# Altium PCB OSP_Carrier_V8_ascii.PcbDoc (part 1 of 3)
Units mm, origin at the board's own origin, x right, y up, seen from the top; angles counter-clockwise.
Board outline 64.1 x 51.1 mm, 4 copper layers (Component Side, Signal Layer 1, Signal Layer 2, Solder Side), stack 1.58 mm thick; 182 components, 144 nets, 1232 pads, 422 vias.
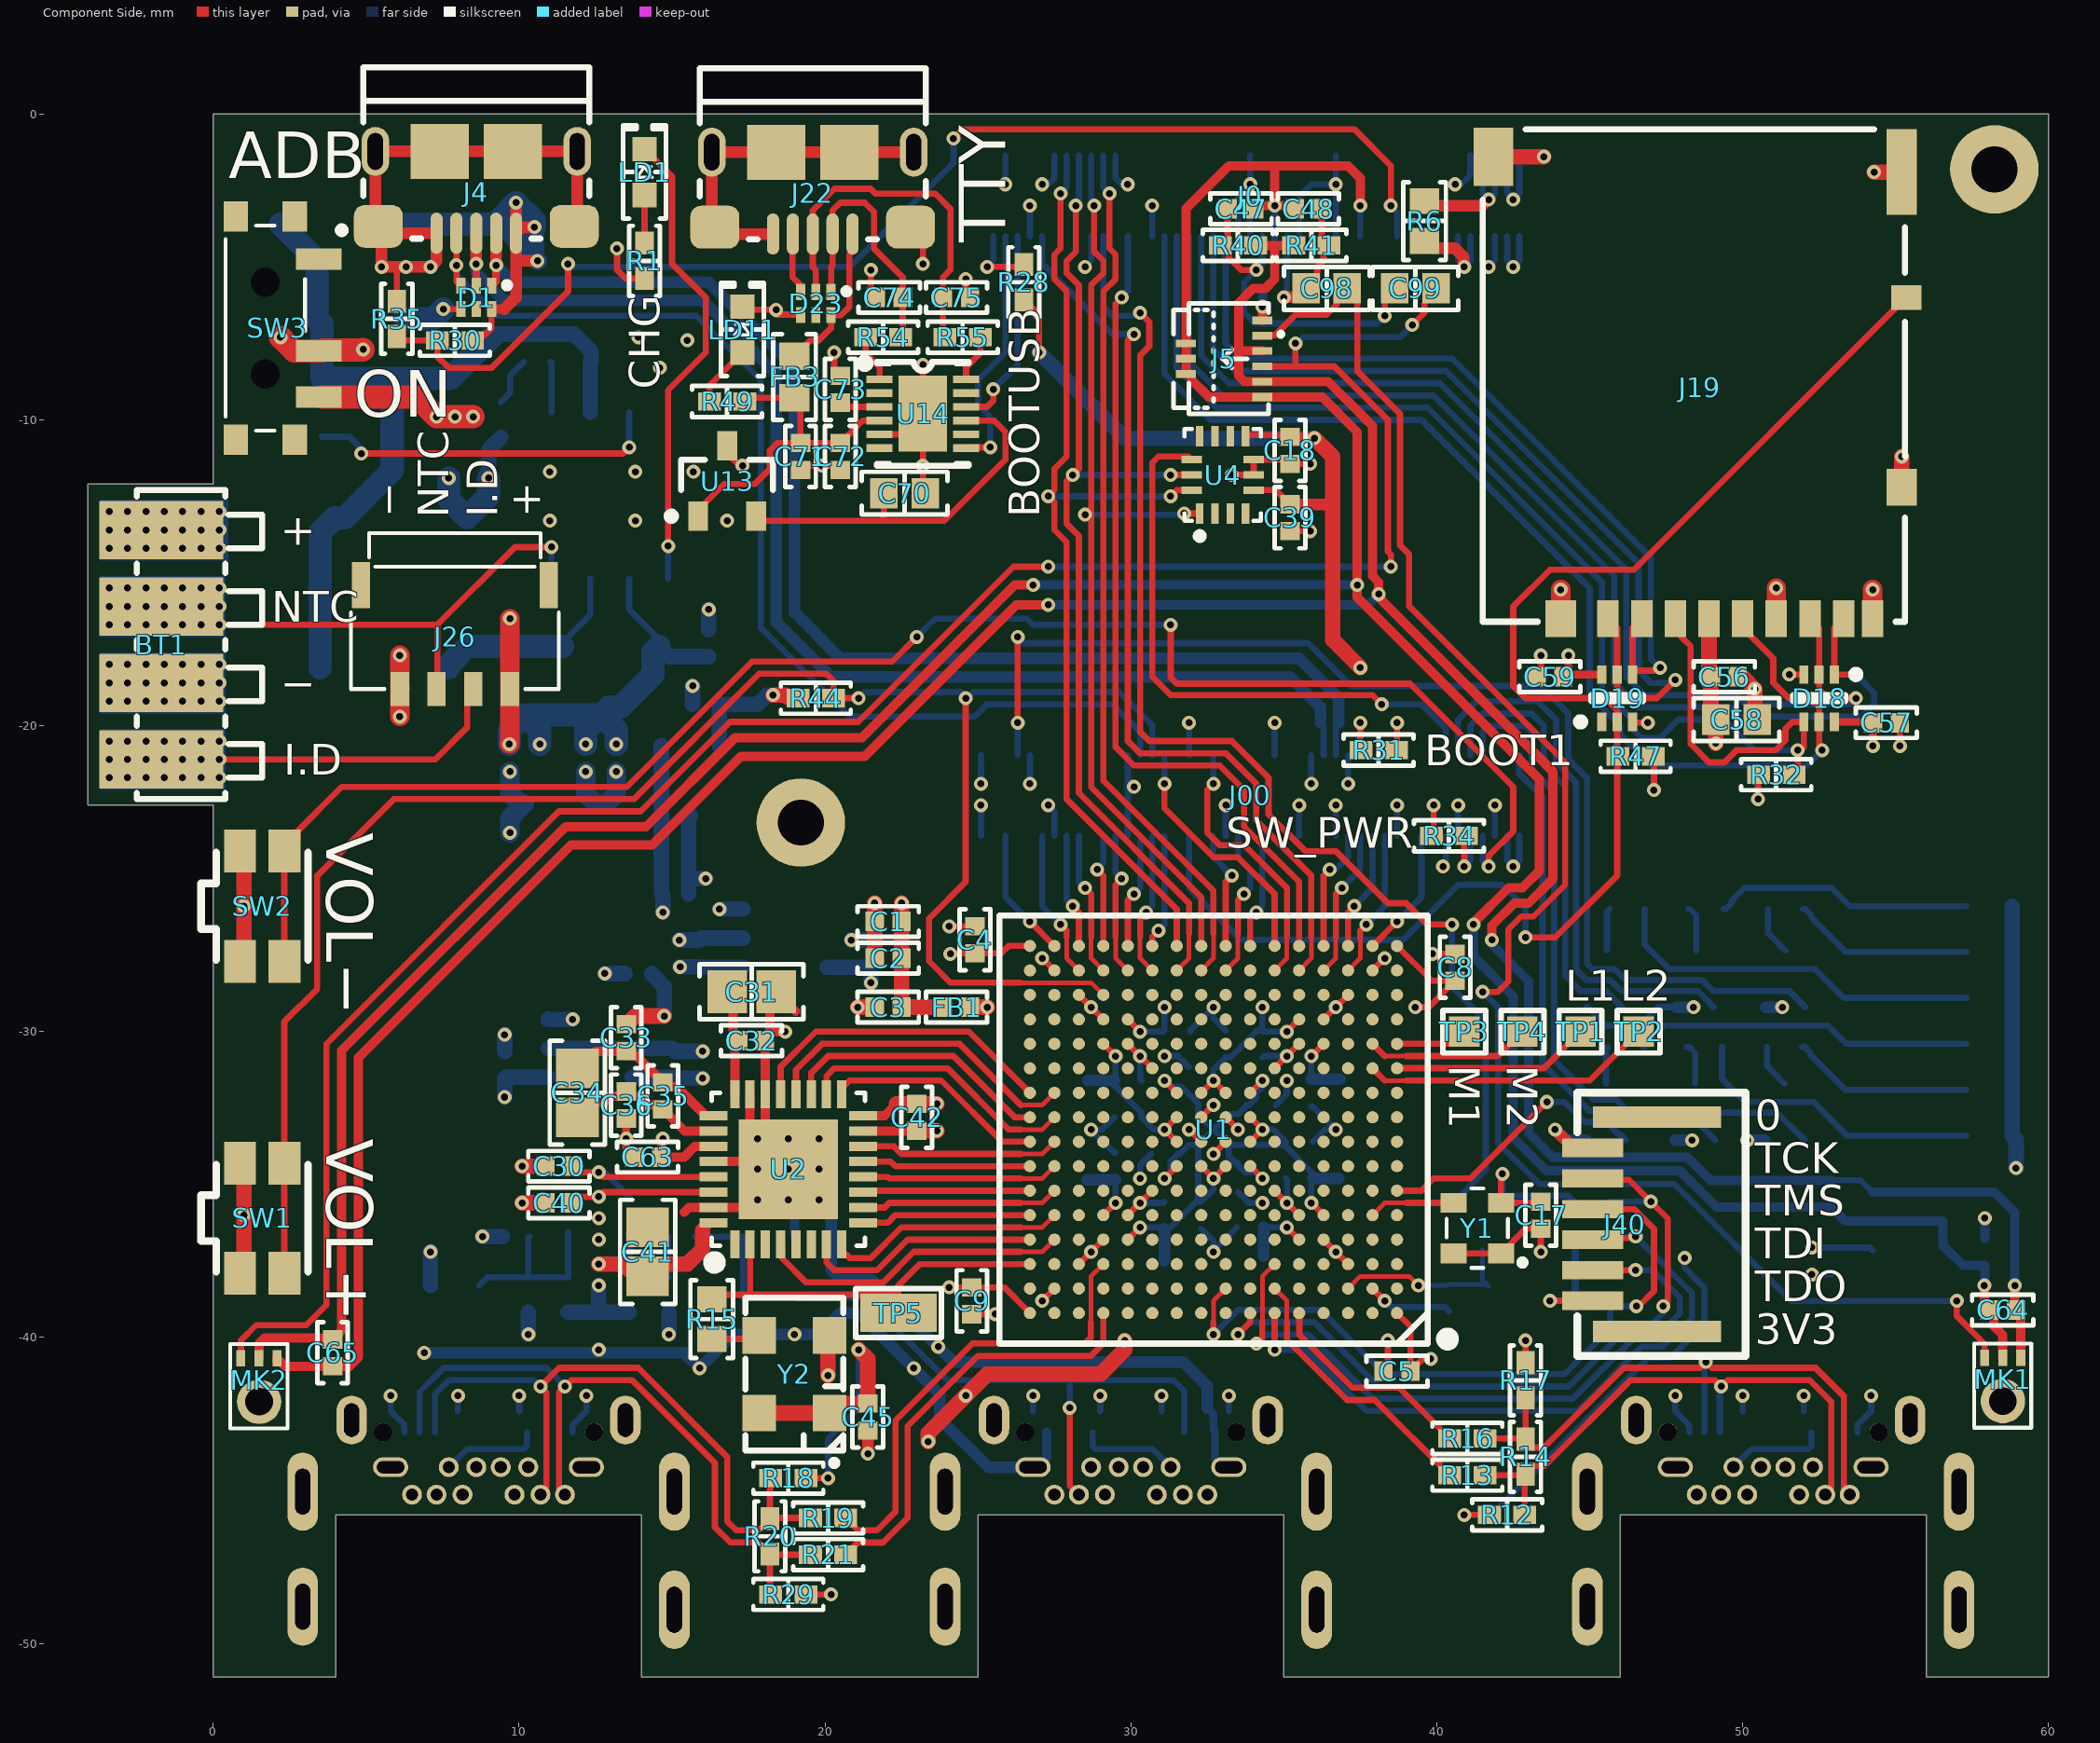
[diagram p0: Component Side view]
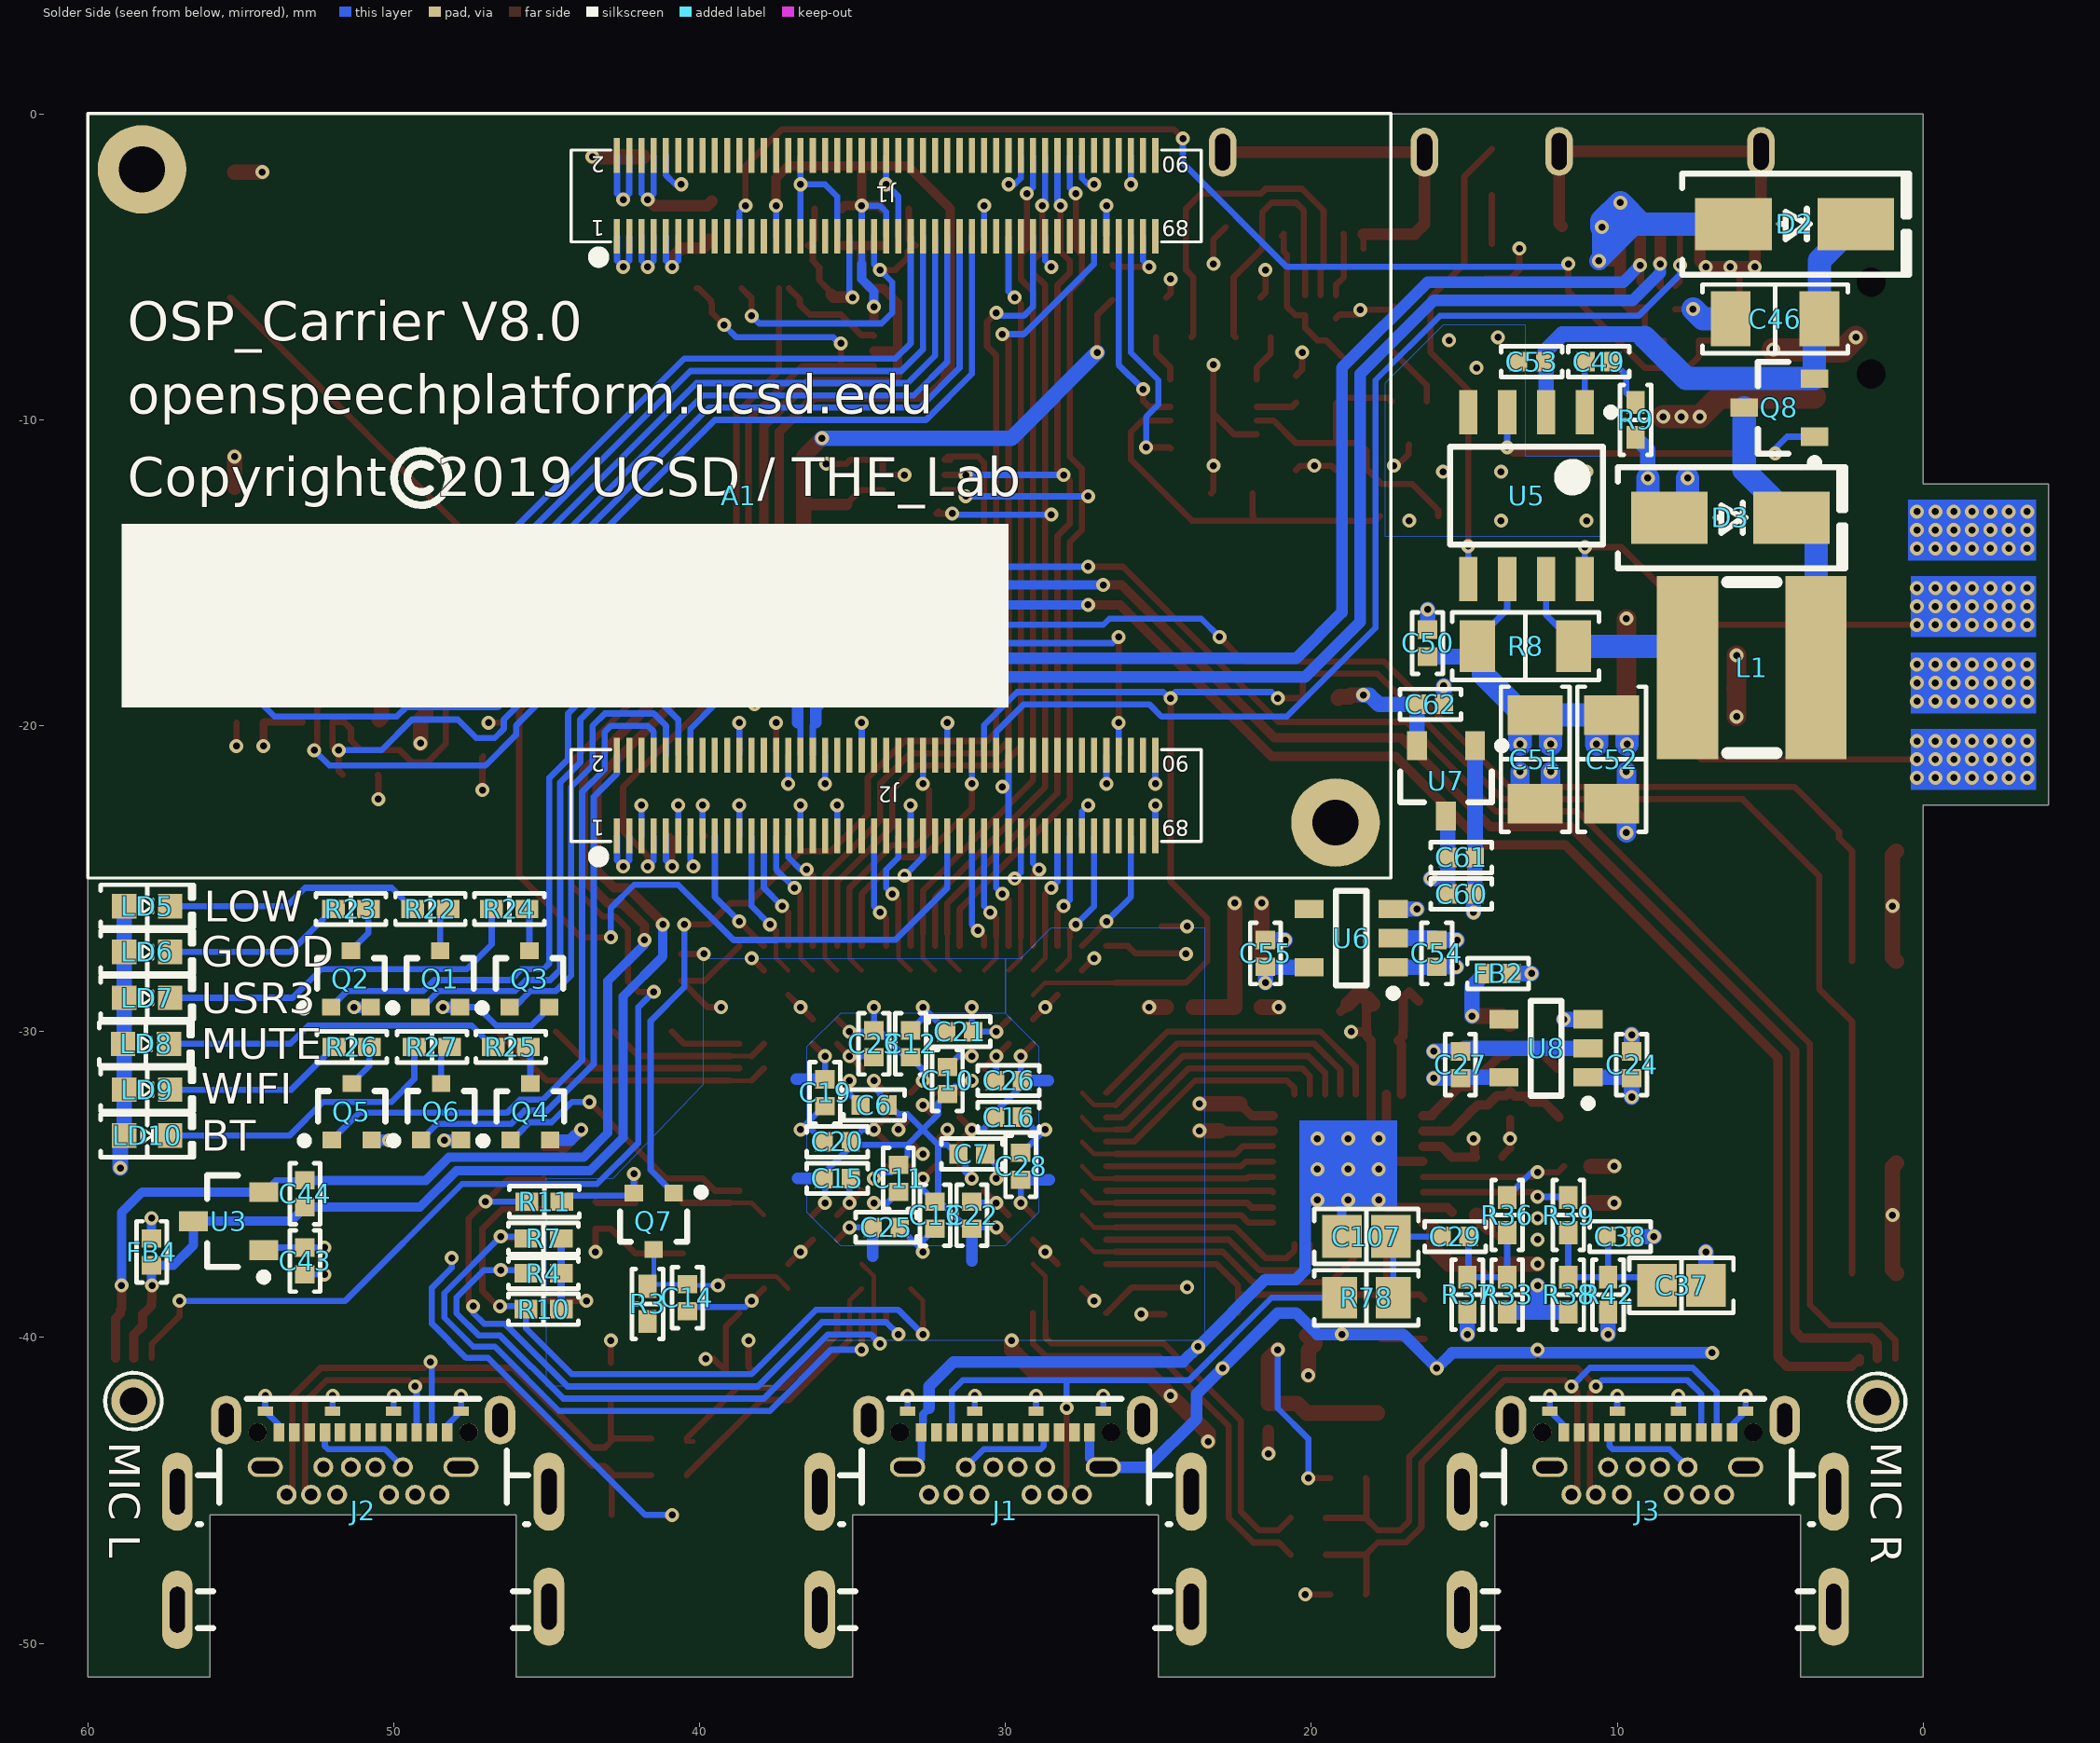
[diagram p1: Solder Side view, seen from below]
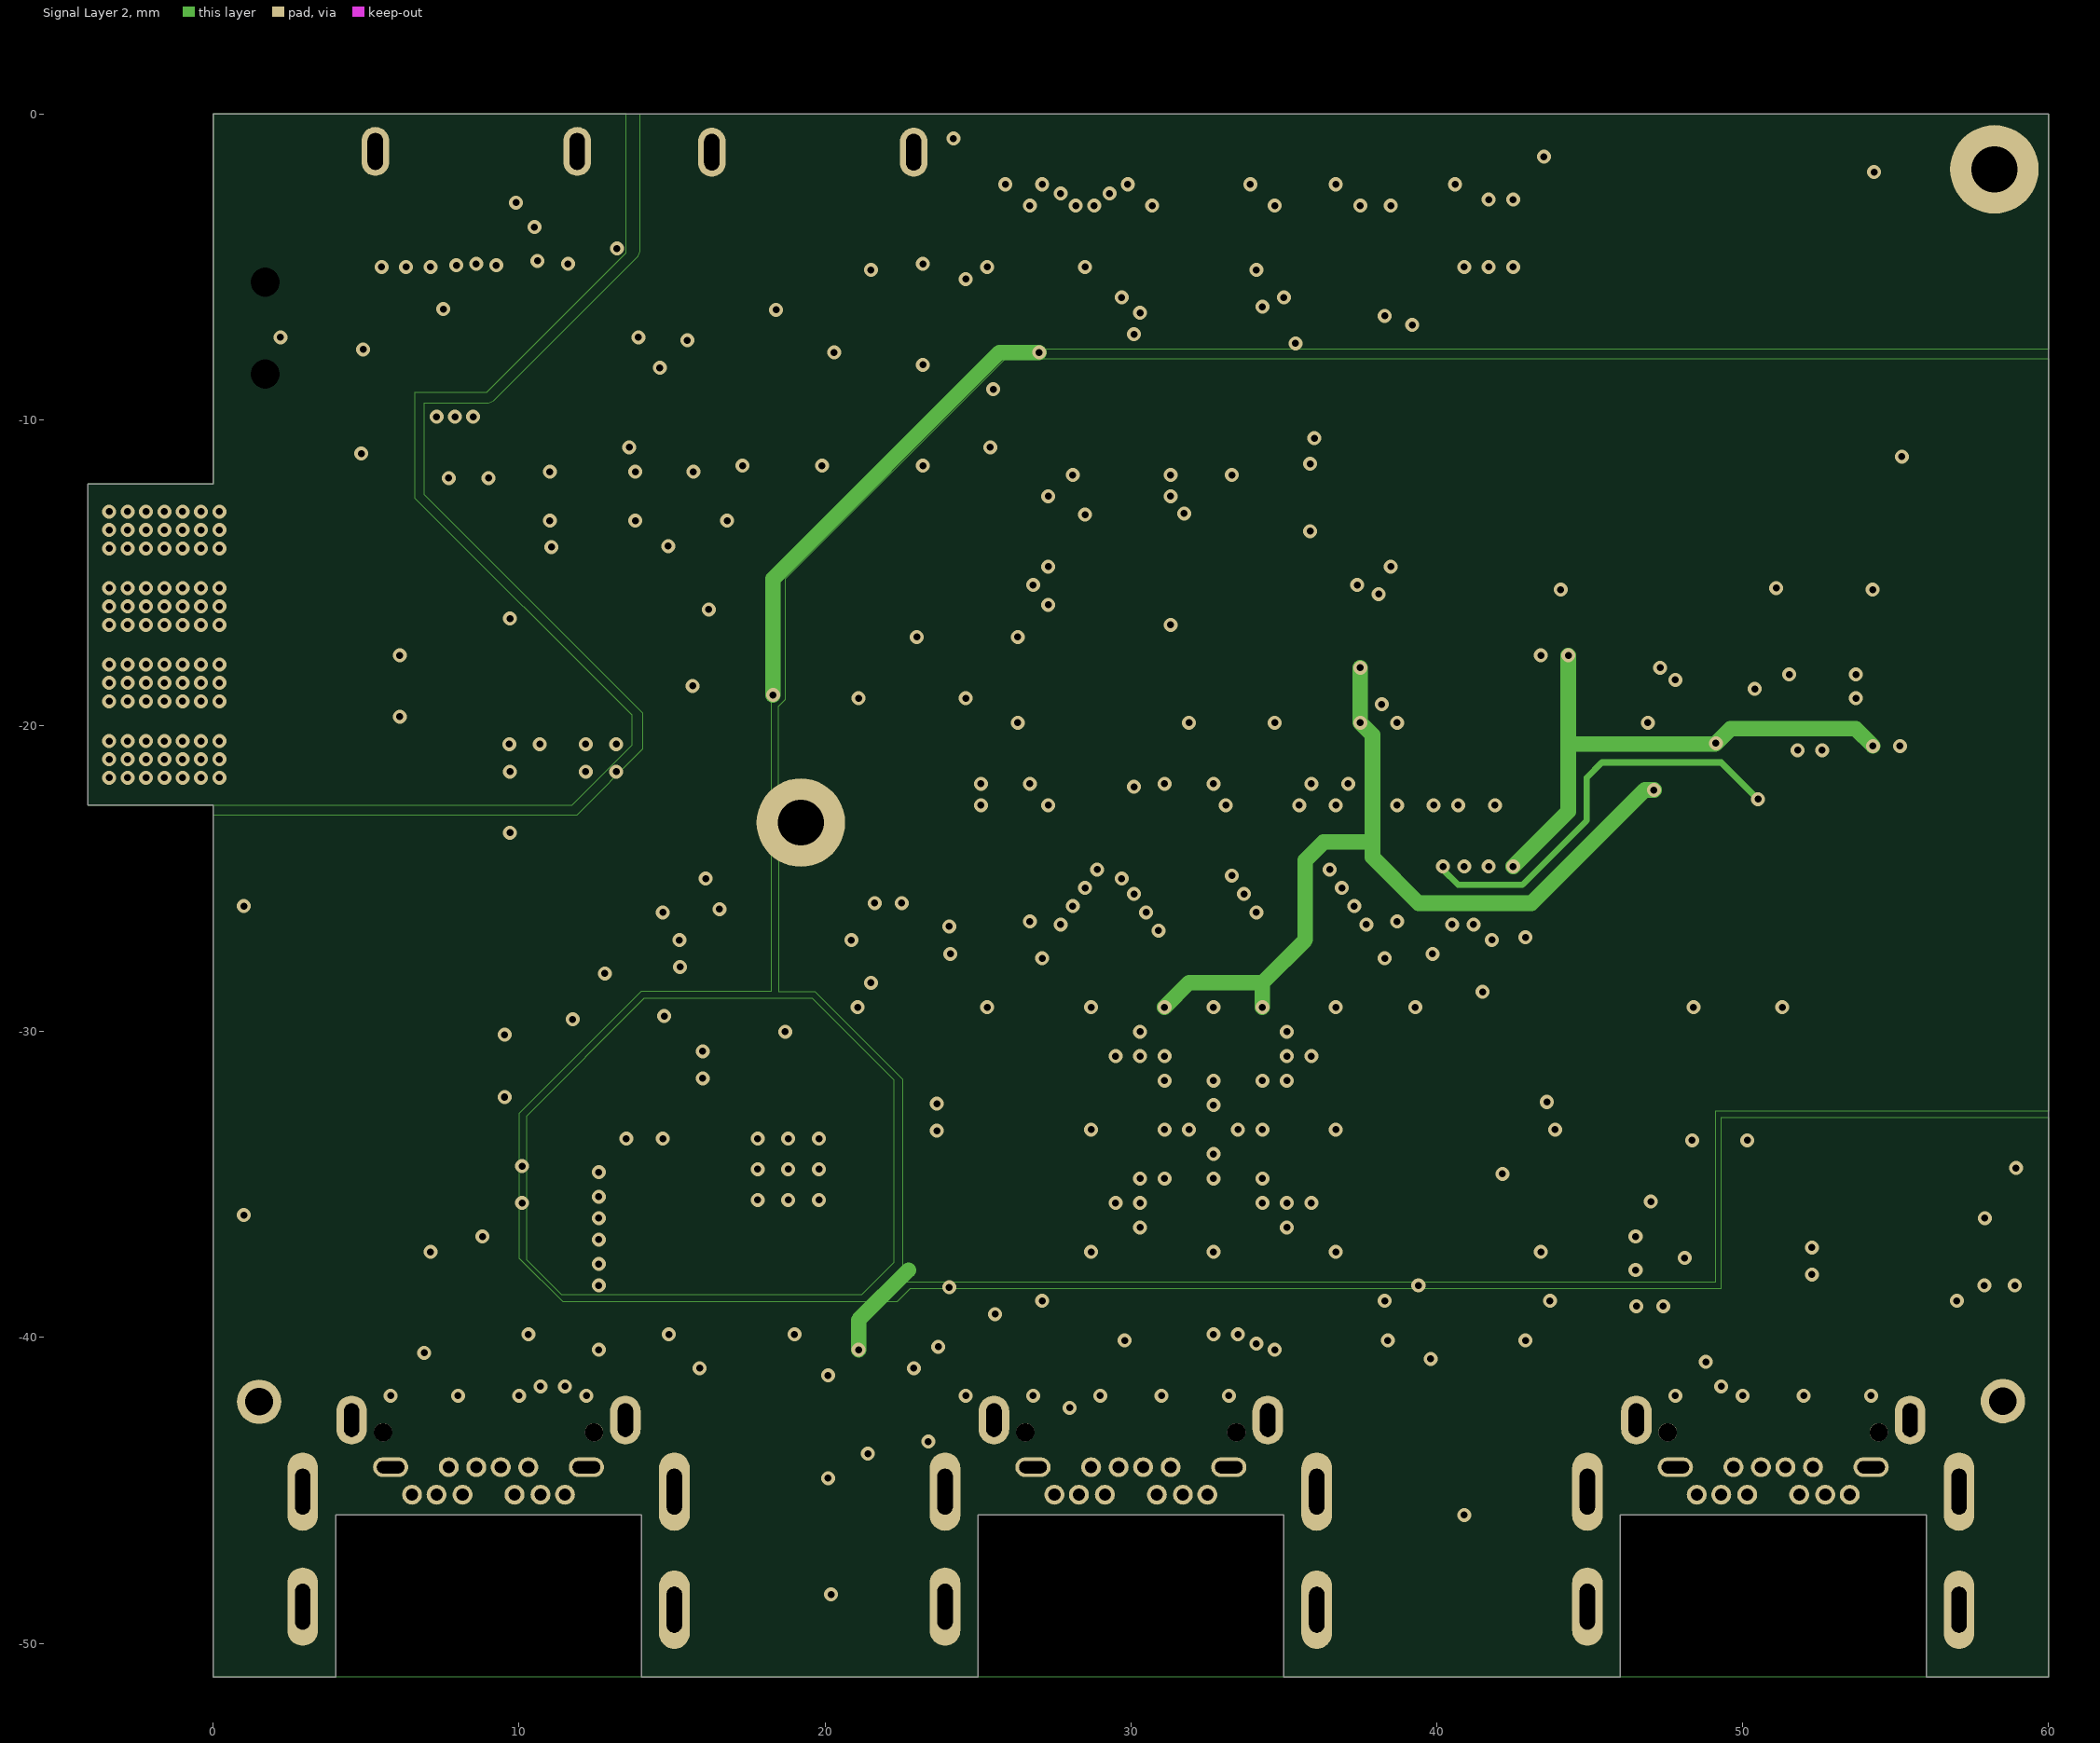
[diagram p2: Signal Layer 2]

## Layer stack, top to bottom
Top Solder: solder mask 0.0102, Solder Resist, Dk 3.5
Component Side: signal copper 0.0356
Dielectric 1: prepreg 0.127, FR-4, Dk 4.2
Signal Layer 1: signal copper 0.0508
Dielectric 3: core 1.1532, FR-4, Dk 4.2
Signal Layer 2: signal copper 0.0508
Dielectric 2: prepreg 0.127, FR-4, Dk 4.2
Solder Side: signal copper 0.0356
Bottom Solder: solder mask 0.0102, Solder Resist, Dk 3.5

## Board outline
0,-51.1 4,-51.1 4,-45.8 14,-45.8 14,-51.1 25,-51.1 25,-45.8 35,-45.8 35,-51.1 46,-51.1 46,-45.8 56,-45.8 56,-51.1 60,-51.1 60,0 0,0 0,-12.1 -4.1,-12.1 -4.1,-22.6 0,-22.6

## Design rules (kind name [scope] priority, off if disabled: settings)
AssemblyTestPointUsage [All] p0: scope1count=1 scope1_0_kind=Board scope1_0_value=Board scope2count=1 scope2_0_kind=Board scope2_0_value=Board commentlength=0
AssemblyTestpoint [All] p0: scope1count=1 scope1_0_kind=Board scope1_0_value=Board scope2count=1 scope2_0_kind=Board scope2_0_value=Board commentlength=0
BoardOutlineClearance [All] p0 off: scope1count=1 scope1_0_kind=Board scope1_0_value=Board scope2count=1 scope2_0_kind=Board scope2_0_value=Board commentlength=47 gap=0.305 // Protel DXP Scope 1 Expression Was: OnCopper
BoardOutlineClearance [OnCopper] p1: gap=0.305 ignorepadtopadclearanceinfootprint=FALSE
Clearance Clearance_Polygon [All] p0 off: scope1count=1 scope1_0_kind=Board scope1_0_value=Board scope2count=1 scope2_0_kind=Board scope2_0_value=Board commentlength=48 gap=0.203 // Protel DXP Scope 1 Expression Was: InPolygon
Clearance [All] p0: scope1count=1 scope1_0_kind=Board scope1_0_value=Board scope2count=1 scope2_0_kind=Board scope2_0_value=Board commentlength=0 gap=0.114
Clearance Clearance_Polygon_FPGA [All] p0 off: scope1count=1 scope1_0_kind=Board scope1_0_value=Board scope2count=1 scope2_0_kind=Board scope2_0_value=Board commentlength=124 gap=0.152 // Protel DXP Scope 1 Expression Was: InPolygon And (OnTopLayer Or OnBottomLayer) And (InNet('+3V3_F') Or InNet('+1V8_IO'))
Clearance Clearance_Polygon_FPGA [InPolygon And (OnTopLayer Or OnBottomLayer) And (InNet('+3V3_F') Or InNet('+1V8_IO'))] p1: gap=0.152 ignorepadtopadclearanceinfootprint=FALSE
Clearance Clearance_Polygon [InPolygon] p2: gap=0.203 ignorepadtopadclearanceinfootprint=FALSE
Clearance [All] p3: gap=0.114 ignorepadtopadclearanceinfootprint=FALSE
ComponentClearance ComponentClearance_J00 [All] p0 off: scope1count=1 scope1_0_kind=Board scope1_0_value=Board scope2count=1 scope2_0_kind=Board scope2_0_value=Board commentlength=80 gap=0 collisioncheckmode=3 // Protel DXP Scope 1 Expression Was: InComponent('J0')   Or InComponent('J00')
ComponentClearance [All] p0: scope1count=1 scope1_0_kind=Board scope1_0_value=Board scope2count=1 scope2_0_kind=Board scope2_0_value=Board commentlength=0 gap=0.254 collisioncheckmode=3
ComponentClearance ComponentClearance_J00 [InComponent('J0')   Or InComponent('J00')] p1: gap=0 collisioncheckmode=3 verticalgap=0 showdistances=FALSE
ComponentClearance [All] p2: gap=0.254 collisioncheckmode=3 verticalgap=0.254 showdistances=FALSE
DiffPairsRouting [All] p0: scope1count=1 scope1_0_kind=Board scope1_0_value=Board scope2count=1 scope2_0_kind=Board scope2_0_value=Board commentlength=0
DiffPairsRouting [All] p1: maxlimit=0.254 minlimit=0.114 mostfreqgap=0.203 toplayer_minwidth=0.152 toplayer_maxwidth=0.381 toplayer_prefwidth=0.203 midlayer1_minwidth=0.152 midlayer1_maxwidth=0.381 midlayer1_prefwidth=0.203 midlayer2_minwidth=0.152 midlayer2_maxwidth=0.381 midlayer2_prefwidth=0.203 bottomlayer_minwidth=0.152 bottomlayer_maxwidth=0.381 bottomlayer_prefwidth=0.203 maxuncoupledlength=12.7
FabricationTestPointUsage [All] p0: scope1count=1 scope1_0_kind=Board scope1_0_value=Board scope2count=1 scope2_0_kind=Board scope2_0_value=Board commentlength=0 valid=0 allowmultiple=FALSE
FabricationTestpoint [All] p0: scope1count=1 scope1_0_kind=Board scope1_0_value=Board scope2count=1 scope2_0_kind=Board scope2_0_value=Board commentlength=0 side=3 testpointundercomponent=TRUE minsize=1.016 maxsize=2.54 preferedsize=1.524 minholesize=0 maxholesize=1.016 preferedholesize=0.813 testpointgrid=0.025
FanoutControl Fanout_BGA [All] p0 off: scope1count=1 scope1_0_kind=Board scope1_0_value=Board scope2count=1 scope2_0_kind=Board scope2_0_value=Board commentlength=69 // Protel DXP Scope 1 Expression Was: IsBGA   Fanout_BGA (Default Rule)
FanoutControl Fanout_LCC [All] p0 off: scope1count=1 scope1_0_kind=Board scope1_0_value=Board scope2count=1 scope2_0_kind=Board scope2_0_value=Board commentlength=69 // Protel DXP Scope 1 Expression Was: IsLCC   Fanout_LCC (Default Rule)
FanoutControl Fanout_SOIC [All] p0 off: scope1count=1 scope1_0_kind=Board scope1_0_value=Board scope2count=1 scope2_0_kind=Board scope2_0_value=Board commentlength=71 // Protel DXP Scope 1 Expression Was: IsSOIC   Fanout_SOIC (Default Rule)
FanoutControl Fanout_Small [All] p0 off: scope1count=1 scope1_0_kind=Board scope1_0_value=Board scope2count=1 scope2_0_kind=Board scope2_0_value=Board commentlength=84 // Protel DXP Scope 1 Expression Was: (CompPinCount < 5)   Fanout_Small (Default Rule)
FanoutControl Fanout_Default [All] p0: scope1count=1 scope1_0_kind=Board scope1_0_value=Board scope2count=1 scope2_0_kind=Board scope2_0_value=Board commentlength=30 // Fanout_Default (Default Rule)
Height [All] p0: scope1count=1 scope1_0_kind=Board scope1_0_value=Board scope2count=1 scope2_0_kind=Board scope2_0_value=Board commentlength=0
Height [All] p1: minheight=0 maxheight=254 prefheight=12.7
HoleSize [All] p0: scope1count=1 scope1_0_kind=Board scope1_0_value=Board scope2count=1 scope2_0_kind=Board scope2_0_value=Board commentlength=0 absolutevalues=TRUE maxlimit=3.2 minlimit=0.025 maxpercent=80.000 minpercent=20.000
HoleSize [All] p1: absolutevalues=TRUE maxlimit=3.2 minlimit=0.025 maxpercent=80.000 minpercent=20.000
HoleToHoleClearance [All] p0: scope1count=1 scope1_0_kind=Board scope1_0_value=Board scope2count=1 scope2_0_kind=Board scope2_0_value=Board commentlength=0
LayerPairs [All] p0: scope1count=1 scope1_0_kind=Board scope1_0_value=Board scope2count=1 scope2_0_kind=Board scope2_0_value=Board commentlength=0 enforce=TRUE
MinimumSolderMaskSliver [All] p0: scope1count=1 scope1_0_kind=Board scope1_0_value=Board scope2count=1 scope2_0_kind=Board scope2_0_value=Board commentlength=0
MinimumSolderMaskSliver [All] p1: minsoldermaskwidth=0.076
NetAntennae [All] p0: scope1count=1 scope1_0_kind=Board scope1_0_value=Board scope2count=1 scope2_0_kind=Board scope2_0_value=Board commentlength=0
PasteMaskExpansion [All] p0: scope1count=1 scope1_0_kind=Board scope1_0_value=Board scope2count=1 scope2_0_kind=Board scope2_0_value=Board commentlength=0 expansion=0
PlaneClearance [All] p0: scope1count=1 scope1_0_kind=Board scope1_0_value=Board scope2count=1 scope2_0_kind=Board scope2_0_value=Board commentlength=0 clearance=0.508
PlaneConnect [All] p0: scope1count=1 scope1_0_kind=Board scope1_0_value=Board scope2count=1 scope2_0_kind=Board scope2_0_value=Board commentlength=0 planeconnectstyle=Relief reliefexpansion=0.508 reliefentries=4 reliefconductorwidth=0.254 reliefairgap=0.254
PolygonConnect PolygonConnect_SOM [All] p0 off: scope1count=1 scope1_0_kind=Board scope1_0_value=Board scope2count=1 scope2_0_kind=Board scope2_0_value=Board commentlength=66 connectstyle=Relief reliefconductorwidth=0.203 reliefentries=4 polygonreliefangle="90 Angle" // Protel DXP Scope 1 Expression Was: InNet('GND') And OnTopLayer
PolygonConnect [All] p0: scope1count=1 scope1_0_kind=Board scope1_0_value=Board scope2count=1 scope2_0_kind=Board scope2_0_value=Board commentlength=0 connectstyle=Relief reliefconductorwidth=0.254 reliefentries=4 polygonreliefangle="90 Angle"
PolygonConnect PolygonConnect_3V3Thermal [All] p0 off: scope1count=1 scope1_0_kind=Board scope1_0_value=Board scope2count=1 scope2_0_kind=Board scope2_0_value=Board commentlength=67 connectstyle=Direct reliefconductorwidth=0.203 reliefentries=4 polygonreliefangle="90 Angle" // Protel DXP Scope 1 Expression Was: InNet('+3V3') And OnTopLayer
PolygonConnect PolygonConnect_SOM [InNet('GND') And OnTopLayer] p1: thpad.connectstyle=Relief thpad.reliefconductorwidth=0.203 thpad.reliefentries=4 thpad.polygonreliefangle="90 Angle" thpad.airgapwidth=0.254 smdpad.connectstyle=Relief smdpad.reliefconductorwidth=0.203 smdpad.reliefentries=4 smdpad.polygonreliefangle="90 Angle" smdpad.airgapwidth=0.178 via.connectstyle=Direct via.reliefconductorwidth=0.203 via.reliefentries=4 via.polygonreliefangle="90 Angle" via.airgapwidth=0.254
PolygonConnect PolygonConnect_3V3Thermal [InNet('+3V3') And OnTopLayer] p2: connectstyle=Direct reliefconductorwidth=0.203 reliefentries=4 polygonreliefangle="90 Angle" airgapwidth=0.254
PolygonConnect [All] p3: thpad.connectstyle=Relief thpad.reliefconductorwidth=0.254 thpad.reliefentries=4 thpad.polygonreliefangle="90 Angle" thpad.airgapwidth=0.254 smdpad.connectstyle=Relief smdpad.reliefconductorwidth=0.254 smdpad.reliefentries=4 smdpad.polygonreliefangle="90 Angle" smdpad.airgapwidth=0.254 via.connectstyle=Direct via.reliefconductorwidth=0.254 via.reliefentries=4 via.polygonreliefangle="90 Angle" via.airgapwidth=0.254
RoutingCorners [All] p0: scope1count=1 scope1_0_kind=Board scope1_0_value=Board scope2count=1 scope2_0_kind=Board scope2_0_value=Board commentlength=0 cornerstyle=45-Degree minsetback=2.54 maxsetback=2.54
RoutingLayers [All] p0: scope1count=1 scope1_0_kind=Board scope1_0_value=Board scope2count=1 scope2_0_kind=Board scope2_0_value=Board commentlength=0 top layer=Automatic mid layer 1=Automatic mid layer 2=Automatic bottom layer=Automatic
RoutingPriority [All] p0: scope1count=1 scope1_0_kind=Board scope1_0_value=Board scope2count=1 scope2_0_kind=Board scope2_0_value=Board commentlength=0
RoutingTopology [All] p0: scope1count=1 scope1_0_kind=Board scope1_0_value=Board scope2count=1 scope2_0_kind=Board scope2_0_value=Board commentlength=0 topology=Shortest
RoutingVias [All] p0: scope1count=1 scope1_0_kind=Board scope1_0_value=Board scope2count=1 scope2_0_kind=Board scope2_0_value=Board commentlength=0 holewidth=0.229 width=0.457 viastyle="Through Hole" minholewidth=0.229 minwidth=0.457 maxholewidth=0.711 maxwidth=1.27
RoutingVias [All] p1: holewidth=0.229 width=0.457 viastyle="Through Hole" minholewidth=0.229 minwidth=0.457 maxholewidth=0.711 maxwidth=1.27
ShortCircuit [All] p0: scope1count=1 scope1_0_kind=Board scope1_0_value=Board scope2count=1 scope2_0_kind=Board scope2_0_value=Board commentlength=0 allowed=FALSE
SilkToBoardRegionClearance [All] p0: scope1count=1 scope1_0_kind=Board scope1_0_value=Board scope2count=1 scope2_0_kind=Board scope2_0_value=Board commentlength=0
SilkToSilkClearance [All] p0: scope1count=1 scope1_0_kind=Board scope1_0_value=Board scope2count=1 scope2_0_kind=Board scope2_0_value=Board commentlength=0
SilkToSilkClearance [All] p1: silktosilkclearance=0
SilkToSolderMaskClearance [All] p0 off: scope1count=1 scope1_0_kind=Board scope1_0_value=Board scope2count=1 scope2_0_kind=Board scope2_0_value=Board commentlength=44 // Protel DXP Scope 1 Expression Was: IsPad
SilkToSolderMaskClearance [IsPad] p1: minsilkscreentomaskgap=0 clearancetoexposedcopper=TRUE
SolderMaskExpansion [All] p0: scope1count=1 scope1_0_kind=Board scope1_0_value=Board scope2count=1 scope2_0_kind=Board scope2_0_value=Board commentlength=0 expansion=0.102
SolderMaskExpansion [All] p1: expansion=0.102
UnRoutedNet [All] p0: scope1count=1 scope1_0_kind=Board scope1_0_value=Board scope2count=1 scope2_0_kind=Board scope2_0_value=Board commentlength=0
UnpouredPolygon [All] p0: scope1count=1 scope1_0_kind=Board scope1_0_value=Board scope2count=1 scope2_0_kind=Board scope2_0_value=Board commentlength=0
Width [All] p0: scope1count=1 scope1_0_kind=Board scope1_0_value=Board scope2count=1 scope2_0_kind=Board scope2_0_value=Board commentlength=0 maxlimit=1.27 minlimit=0.152 preferedwidth=0.203
Width [All] p1: maxlimit=1.27 minlimit=0.152 preferedwidth=0.203
23 further rules are at their usual default settings.

## Classes and differential pairs
component class OSP_Carrier_V8_DJB: C12 C13 C14 C15 C17 C19 C20 C21 C22 C23 C25 J2 J3 J40 Q7 R3 R4 R7 R10 R11 R12 R13 R14 R16 R17 R18 R19 R20 R21 R29 TP1 TP2 TP3 TP4 Y1
component class OSP_Carrier_V8_Misc: C18 C39 J0 J00 LD5 LD6 LD7 LD8 LD9 LD10 Q1 Q2 Q3 Q4 Q5 Q6 R22 R23 R24 R25 R26 R27 R28 R31 R34 R44 SW1 SW2 U4
component class OSP_Carrier_V8_PMIC_Audio: C43 C44 C47 C48 C64 C65 C98 C99 FB4 J5 MK1 MK2 R6 R40 R41 U3
component class OSP_Carrier_V8_Power: A1 BT1 C1 C2 C3 C4 C5 C6 C7 C8 C9 C10 C11 C46 C49 C50 C51 C52 C53 C54 C55 C60 C61 C62 D2 D3 FB1 J26 L1 LD1 Q8 R1 R8 R9 SW3 U1 U5 U6 U7
component class OSP_Carrier_V8_SD: C56 C57 C58 C59 D18 D19 J19 R32 R47
component class OSP_Carrier_V8_USB: C70 C71 C72 C73 C74 C75 D1 D23 FB3 J4 J22 LD11 R30 R35 R49 R54 R55 U13 U14
component class OSP_Carrier_V8_FM-ExG: C16 C24 C26 C27 C28 C29 C30 C31 C32 C33 C34 C35 C36 C37 C38 C40 C41 C42 C45 C63 C107 FB2 J1 R15 R33 R36 R37 R38 R39 R42 R78 TP5 U2 U8 Y2
differential pair R_PRE: +R_PRE_P -R_PRE_N
differential pair R_LVDS: +R_LVDS_P -R_LVDS_N
differential pair L_PRE: +L_PRE_P -L_PRE_N
differential pair L_LVDS: +L_LVDS_P -L_LVDS_N
differential pair USB_D: +USB_D_P -USB_D_N
differential pair USB_U: +USB_U_P -USB_U_N
differential pair " ": +USB_UX_P -USB_UX_N

## Components (designator, comment, footprint, x,y, rotation, side; value= is the part's Value field where it differs from the comment)
A1 "DART-SD410" DART-SD410 17.4,0.02 r0 bottom locked
BT1 "BP2000 / AVX 9155-004-201-006" SAMSUNG_BP2000 1,-5.6 r0 top locked
C1 "4.7uF" "CAP 0402/1005" 22.066,-26.4 r0 top
C2 "1uF" "CAP 0402/1005" 22.066,-27.6 r180 top
C3 "0.1uF" "CAP 0402/1005" 22.066,-29.2 r0 top
C4 "0.1uF" "CAP 0402/1005" 24.9,-27 r270 top
C5 "0.1uF" "CAP 0402/1005" 38.7,-41.1 r0 top
C6 "0.1uF" "CAP 0402/1005" 34.3,-32.4 r180 bottom
C7 "0.1uF" "CAP 0402/1005" 31.1,-34 r0 bottom
C8 "0.01uF" "CAP 0402/1005" 40.6,-27.9 r270 top
C9 "0.01uF" "CAP 0402/1005" 24.8,-38.8 r90 top
C10 "0.01uF" "CAP 0402/1005" 31.9,-31.6 r270 bottom
C11 "0.01uF" "CAP 0402/1005" 33.5,-34.8 r90 bottom
C12 "0.1uF" "CAP 0402/1005" 33.1,-30.4 r270 bottom
C13 "0.1uF" "CAP 0402/1005" 32.3,-36 r90 bottom
C14 "0.1uF" "CAP 0402/1005" 40.4,-38.7 r270 bottom
C15 "0.1uF" "CAP 0402/1005" 35.5,-34.8 r0 bottom
C16 "0.1uF" "CAP 0402/1005" 29.9,-32.8 r0 bottom
C17 "0.1uF" "CAP 0402/1005" 43.4,-36 r270 top
C18 "0.1uF" "CAP 0402/1005" 35.2,-11 r270 top
C19 "0.1uF" "CAP 0402/1005" 35.9,-32 r90 bottom
C20 "0.1uF" "CAP 0402/1005" 35.5,-33.6 r180 bottom
C21 "0.01uF" "CAP 0402/1005" 31.5,-30 r0 bottom
C22 "0.01uF" "CAP 0402/1005" 31.1,-36 r90 bottom
C23 "0.01uF" "CAP 0402/1005" 34.3,-30.4 r270 bottom
C24 "1uF" "CAP 0402/1005" 9.528,-31.085 r90 bottom
C25 "0.01uF" "CAP 0402/1005" 33.9,-36.4 r180 bottom
C26 "0.01uF" "CAP 0402/1005" 29.9,-31.6 r0 bottom
C27 "1uF" "CAP 0402/1005" 15.128,-31.085 r90 bottom
C28 "0.01uF" "CAP 0402/1005" 29.5,-34.4 r90 bottom
C29 "0.33uF" "CAP 0402/1005" 15.3,-36.7 r180 bottom
C30 "15pF" "CAP 0402/1005" 11.3,-34.4 r0 top
C31 "10uF" "CAP 0805/2012" 17.6,-28.7 r180 top
C32 "0.1uF" "CAP 0402/1005" 17.6,-30.3 r0 top
C33 "0.1uF" "CAP 0402/1005" 13.5,-30.2 r90 top
C34 "10uF" "CAP 0805/2012" 11.9,-32 r90 top
C35 "0.1uF" "CAP 0402/1005" 14.7,-32.1 r270 top
C36 "0.1uF" "CAP 0402/1005" 13.5,-32.4 r270 top
C37 "10uF" "CAP 0805/2012" 7.9,-38.3 r0 bottom
C38 "0.1uF" "CAP 0402/1005" 9.9,-36.7 r180 bottom
C39 "0.1uF" "CAP 0402/1005" 35.2,-13.2 r270 top
C40 "15pF" "CAP 0402/1005" 11.3,-35.6 r0 top
C41 "10uF" "CAP 0805/2012" 14.2,-37.2 r270 top
C42 "1uF" "CAP 0402/1005" 23,-32.8 r270 top
C43 "1uF" "CAP 0402/1005" 52.9,-37.5 r270 bottom
C44 "1uF" "CAP 0402/1005" 52.9,-35.3 r270 bottom
C45 "0.1uF" "CAP 0402/1005" 21.4,-42.6 r90 top
C46 "10uF" "CAP 1206/3216" 4.84,-6.7 r0 bottom
C47 "33pF" "CAP 0402/1005" 33.6,-3.1 r180 top
C48 "33pF" "CAP 0402/1005" 35.8,-3.1 r0 top
C49 "0.47uF" "CAP 0402/1005" 10.6,-8.1 r180 bottom
C50 "1uF" "CAP 0402/1005" 16.2,-17.3 r90 bottom
C51 "10uF" "CAP 1206/3216" 12.678,-21.1 r270 bottom
C52 "10uF" "CAP 1206/3216" 10.178,-21.1 r270 bottom
C53 "0.1uF" "CAP 0402/1005" 12.8,-8.1 r0 bottom
C54 "1uF" "CAP 0402/1005" 15.9,-27.446 r90 bottom
C55 "1uF" "CAP 0402/1005" 21.5,-27.446 r90 bottom
C56 "0.1uF" "CAP 0402/1005" 49.4,-18.4 r180 top
C57 "47pF" "CAP 0402/1005" 54.7,-19.9 r180 top
C58 "1uF" "CAP 0603/1608" 49.8,-19.8 r180 top
C59 "0.1uF" "CAP 0402/1005" 43.7,-18.4 r0 top
C60 "4.7uF" "CAP 0402/1005" 15.1,-25.5 r180 bottom
C61 "0.1uF" "CAP 0402/1005" 15.1,-24.306 r180 bottom
C62 "1uF" "CAP 0402/1005" 16.1,-19.3 r180 bottom
C63 "1uF" "CAP 0402/1005" 14.2,-34.1 r180 top
C64 "0.1uF" "CAP 0402/1005" 58.5,-39.1 r0 top
C65 "0.1uF" "CAP 0402/1005" 3.9,-40.5 r270 top
C70 "1uF" "CAP 0603/1608" 22.6,-12.4 r180 top
C71 "4.7uF" "CAP 0402/1005" 19.2,-11.2 r90 top
C72 "0.1uF" "CAP 0402/1005" 20.5,-11.2 r90 top
C73 "0.1uF" "CAP 0402/1005" 20.5,-9 r270 top
C74 "47pF" "CAP 0402/1005" 22.1,-6 r0 top
C75 "47pF" "CAP 0402/1005" 24.3,-6 r180 top
C98 "1uF" "CAP 0603/1608" 36.4,-5.7 r0 top
C99 "1uF" "CAP 0603/1608" 39.3,-5.7 r0 top
C107 "1000pF" "CAP 0805/2012" 18.2,-36.7 r180 bottom
D1 "TPD4S012" TI_SON6 8.6,-6 r180 top
D2 "B330" "DO214AC SMA" 4.2,-3.6 r180 bottom
D3 "B330" "DO214AC SMA" 6.3,-13.2 r180 bottom
D18 "TPD4E001" TI_SOT-563_DRL 52.5,-19.1 r270 top
D19 "TPD4E001" TI_SOT-563_DRL 45.9,-19.1 r90 top
D23 "TPD4S012" TI_SON6 19.7,-6.2 r180 top
FB1 "220 Ohm @ 100MHz" "FER 0402/1005" 24.3,-29.2 r0 top
FB2 "220 Ohm @ 100MHz" "FER 0402/1005" 13.9,-28.1 r0 bottom
FB3 "220 Ohm @ 100MHz" "FER 0603/1608" 19,-8.6 r90 top
FB4 "220 Ohm @ 100MHz" "FER 0402/1005" 57.912,-37.2 r90 bottom
J0 "DF40C-90DS-0.4V(51)" Hirose_DF40C-90DS-0.4V(51) 33.9,-2.68 r0 top
J00 "DF40C-90DS-0.4V(51)" Hirose_DF40C-90DS-0.4V(51) 33.9,-22.28 r0 top
J1 "USB-C" TE_USB-C_2129691-1 30,-47.6 r0 bottom
J2 "USB-C" TE_USB-C_2129691-1 51,-47.6 r0 bottom
J3 "USB-C" TE_USB-C_2129691-1 9,-47.6 r0 bottom
J4 "Micro USB" "FCI USB 10118193-0001LF" 8.6,-1.275 r0 top
J5 "FFC" HIROSE_FH58M-7S-0.25SHW-99 33.6,-8 r90 top
J19 "DM3AT-SF-PEJM5" "HIROSE DM3AT-SF-PEJM5" 48.8,-8.675 r180 top
J22 "Micro USB" "FCI USB 10118193-0001LF" 19.6,-1.3 r0 top
J26 "Shallow" AMPHENOL_10125839-04RAEHLF_DNP 7.9,-16.8 r180 top
J40 "FFC" AMPHENOL_HFW6R-1STE1LF 47.1,-36.3 r90 top
L1 "6.8uH" LAIRD_TYS6028 5.6,-18.1 r180 bottom
LD1 "Red" "LED 0603/1608 RED" 14.1,-1.9 r90 top
LD5 "Red" "LED 0603/1608 RED" 58.06,-25.9 r180 bottom
LD6 "Green" "LED 0603/1608 GREEN" 58.06,-27.397 r180 bottom
LD7 "Green" "LED 0603/1608 GREEN" 58.06,-28.897 r180 bottom
LD8 "Yellow" "LED 0603/1608 YELLOW" 58.1,-30.4 r180 bottom
LD9 "Yellow" "LED 0603/1608 YELLOW" 58.06,-31.9 r180 bottom
LD10 "Blue" "LED 0603/1608 BLUE" 58.06,-33.4 r180 bottom
LD11 "Green" "LED 0603/1608 GREEN" 17.3,-7.05 r90 top
MK1 "MM023802-1" MEMS_MIC 58.5,-41.6 r0 top
MK2 "MM023802-1" MEMS_MIC 1.493,-41.62 r0 top
Q1 "NX3020NAKW,115" "NXP SOT-323-3" 48.48,-28.275 r90 bottom
Q2 "NX3020NAKW,115" "NXP SOT-323-3" 51.4,-28.275 r90 bottom
Q3 "NX3020NAKW,115" "NXP SOT-323-3" 45.561,-28.275 r90 bottom
Q4 "NX3020NAKW,115" "NXP SOT-323-3" 45.532,-32.621 r90 bottom
Q5 "NX3020NAKW,115" "NXP SOT-323-3" 51.371,-32.617 r90 bottom
Q6 "NX3020NAKW,115" "NXP SOT-323-3" 48.451,-32.617 r90 bottom
Q7 "NX3020NAKW,115" "NXP SOT-323-3" 41.5,-36.2 r270 bottom
Q8 "PMV30XPEAR" NXP_SOT23 4.7,-9.6 r0 bottom
R1 "2k" "RES 0402/1005" 14.1,-4.8 r270 top
R3 "4.7k" "RES 0402/1005" 41.7,-38.9 r270 bottom
R4 "10k" "RES 0402/1005" 45.1,-37.9 r180 bottom
R6 "0.0" "RES 0603/1608" 39.6,-3.5 r90 top
R7 "10k" "RES 0402/1005" 45.1,-36.76 r180 bottom
R8 "0.2" "STACKPOLE CSR1206" 13,-17.4 r180 bottom
R9 "2.2k" "RES 0402/1005" 9.4,-10 r270 bottom
R10 "10k" "RES 0402/1005" 45.1,-39.075 r180 bottom
R11 "10k" "RES 0402/1005" 45.075,-35.56 r0 bottom
R12 "2k" "RES 0402/1005" 42.3,-45.8 r180 top
R13 "100" "RES 0402/1005" 41,-44.5 r0 top
R14 "115" "RES 0402/1005" 42.9,-43.9 r270 top
R15 "0.0" "RES 0603/1608" 16.3,-39.4 r270 top
R16 "100" "RES 0402/1005" 41,-43.3 r0 top
R17 "2k" "RES 0402/1005" 42.9,-41.4 r270 top
R18 "2k" "RES 0402/1005" 18.8,-44.6 r0 top
R19 "100" "RES 0402/1005" 20.1,-45.9 r180 top
R20 "115" "RES 0402/1005" 18.2,-46.5 r90 top
R21 "100" "RES 0402/1005" 20.1,-47.1 r180 top
R22 "200" "RES 0402/1005" 48.8,-25.992 r0 bottom
R23 "200" "RES 0402/1005" 51.4,-25.992 r0 bottom
R24 "200" "RES 0402/1005" 46.224,-25.992 r0 bottom
R25 "200" "RES 0402/1005" 46.175,-30.5 r0 bottom
R26 "200" "RES 0402/1005" 51.371,-30.5 r0 bottom
R27 "200" "RES 0402/1005" 48.75,-30.5 r0 bottom
R28 "10k" "RES 0402/1005" 26.5,-5.5 r270 top
R29 "2k" "RES 0402/1005" 18.8,-48.4 r180 top
R30 "100k" "RES 0402/1005" 7.9,-7.4 r0 top
R31 "10k" "RES 0402/1005" 38.1,-20.8 r180 top
R32 "100k" "RES 0402/1005" 51.1,-21.6 r180 top
R33 "1k" "RES 0402/1005" 13.6,-38.6 r270 bottom
R34 "10k" "RES 0402/1005" 40.4,-23.6 r0 top
R35 "47k" "RES 0402/1005" 6,-6.7 r270 top
R36 "22" "RES 0402/1005" 13.6,-36 r90 bottom
R37 "1k" "RES 0402/1005" 14.9,-38.6 r90 bottom
R38 "1k" "RES 0402/1005" 11.6,-38.6 r270 bottom
R39 "22" "RES 0402/1005" 11.6,-36 r90 bottom
R40 "10k" "RES 0402/1005" 33.5,-4.3 r0 top
R41 "10k" "RES 0402/1005" 35.9,-4.3 r180 top
R42 "1k" "RES 0402/1005" 10.3,-38.6 r90 bottom
R44 "10k" "RES 0402/1005" 19.7,-19.1 r180 top
R47 "1M" "RES 0402/1005" 46.5,-21 r0 top
R49 "470" "RES 0402/1005" 16.8,-9.4 r180 top
R54 "33" "RES 0402/1005" 21.9,-7.3 r0 top
R55 "33" "RES 0402/1005" 24.5,-7.3 r180 top
R78 "0.0" "RES 0805/2012" 18.2,-38.7 r180 bottom
SW1 "EVQ-P7A01P" PANASONIC_EVQ-P7A 1.6,-36.1 r270 top
SW2 "EVQ-P7A01P" PANASONIC_EVQ-P7A 1.6,-25.9 r270 top
SW3 "PCM12SMTR" *SW_PCM12SMTR_PCM12SMTR(PRIMARY) 1.7,-7 r270 top
TP1 "TP_SMD_1MM_SQ" TP_SMD_1MM_SQ 44.7,-30 r0 top
TP2 "TP_SMD_1MM_SQ" TP_SMD_1MM_SQ 46.6,-30 r90 top
TP3 "TP_SMD_1MM_SQ" TP_SMD_1MM_SQ 40.9,-30 r90 top
TP4 "TP_SMD_1MM_SQ" TP_SMD_1MM_SQ 42.8,-30 r90 top
TP5 "TP_SMD_JULIAN" TP_SMD_JULIAN 22.4,-39.2 r180 top
U1 "MachXO3LF-6900C" LCMXO3_caBGA_BG256 32.7,-33.2 r180 top locked
U2 "AD9235BCPZRL7-20" CP_32_2-M 18.8,-34.5 r90 top
U3 "AP7313-18SAG-7" "DIODES SOT-23-3" 55.4,-36.2 r0 bottom
U4 "BMI160" BOSCH_LGA14 33,-11.8 r90 top
U5 "LTC4002" AD_LT_S8 12.965,-12.475 r270 bottom
U6 "BU33SD5WG" ROHM_SSOP5 18.7,-26.945 r0 bottom
U7 "AP7313-18SAG-7" "DIODES SOT-23-3" 15.6,-21.8 r270 bottom
U8 "BU33SD5WG" ROHM_SSOP5 12.328,-30.545 r0 bottom
U13 "AP7313-18SAG-7" "DIODES SOT-23-3" 16.8,-12 r90 top
U14 "FT234XD" FTDI_DFN12 23.2,-9.8 r0 top
Y1 "12.288 MHz" OSC_2.5x2.0mm 42.1,-37.25 r90 top
Y2 "1.544MHz" ABRACON_ASFLMB 19,-41.2 r90 top

## Footprints (in the part's own frame and the unit in brackets; to place one, negate y for a bottom-side part, rotate by r counter-clockwise, add the part's x,y. Pads: shape width x height; smd on the part's side, far side on the other; paste and mask are expansions set on the pad)
*SW_PCM12SMTR_PCM12SMTR(PRIMARY) [mm]
  rect 0.7x1.5 smd: 1(-2.25,1.75) 2(0.75,1.75) 3(2.25,1.75)
  round 0.9 hole 0.95 unplated: None(-1.5,0) None(1.5,0)
  rect 1x0.8 smd: S(-3.65,-0.965) S(-3.65,0.965) S(3.65,-0.965) S(3.65,0.965)
  silkscreen extent -3.35,-1.3 3.35,2.6
ABRACON_ASFLMB [mm] "Abracon ASFLMB series MEMS oscillator"
  rect 1.2x1.1 smd: 1(-1.27,-1.15) 2(1.27,-1.15) 3(1.27,1.15) 4(-1.27,1.15)
  silkscreen extent -3,-1.6 2.5,1.6
AD_LT_S8 [mm] "SOIC8 by Analog Devices / Linear Technology"
  rect 1.45x0.6 smd: 1(-2.725,1.905) 2(-2.725,0.635) 3(-2.725,-0.635) 4(-2.725,-1.905) 5(2.725,-1.905) 6(2.725,-0.635) 7(2.725,0.635) 8(2.725,1.905)
  silkscreen extent -2.85,-2.5 1.6,2.88
AMPHENOL_10125839-04RAEHLF_DNP [mm] "Amphenol 10125839-04RAEHLF 4-pin shallow SMD connector (DO NOT POPULATE)"
  rect 0.6x1.5 smd: 0(-3.07,-1.4) 0(3.07,-1.4)
  rect 0.6x1.1 smd: 1(-1.8,2) 2(-0.6,2) 3(0.6,2) 4(1.8,2)
  silkscreen extent -3.4,-3.1 3.4,2
AMPHENOL_HFW6R-1STE1LF [mm] "Amphenol HFW6R-1STE1LF 6-pin flat flexible cable connector"
  rect 0.7x4.2 smd: 0(-3.5,-0.1) 0(3.5,-0.1)
  rect 0.6x2 smd: 1(-2.5,2) 2(-1.5,2) 3(-0.5,2) 4(0.5,2) 5(1.5,2) 6(2.5,2)
  silkscreen extent -4.3,-3 4.3,2.5
BOSCH_LGA14 [mm] "Bosch BMI160"
  rect 0.675x0.25 smd: 1(-1.262,0.75) 2(-1.262,0.25) 3(-1.262,-0.25) 4(-1.262,-0.75) 8(1.262,-0.75) 9(1.262,-0.25) 10(1.262,0.25) 11(1.262,0.75)
  rect 0.25x0.675 smd: 5(-0.5,-1.012) 6(0,-1.012) 7(0.5,-1.012) 12(0.5,1.012) 13(0,1.012) 14(-0.5,1.012)
  silkscreen extent -2.1,-1.25 1.5,1.25
"CAP 0402/1005" [mm] "Chip Capacitor, 2-Leads, Body 1.02x0.51mm, IPC Medium Density"
  rect 0.6x0.64 smd: 1(-0.44,0) 2(0.44,0)
  silkscreen extent -1,-0.5 1,0.5
"CAP 0603/1608" [mm] "Chip Capacitor, 2-Leads, Body 1.60x0.80mm, IPC Medium Density"
  rect 0.9x1 smd: 1(-0.675,0) 2(0.675,0)
  silkscreen extent -1.4,-0.7 1.4,0.7
"CAP 0805/2012" [mm] "Chip Capacitor, 2-Leads, Body 2.00x1.20mm, IPC Medium Density"
  rect 1.3x1.4 smd: 1(-0.8,0) 2(0.8,0)
  silkscreen extent -1.7,-0.9 1.7,0.9
"CAP 1206/3216" [mm] "Chip Capacitor, 2-Leads, Body 3.25x1.60mm, IPC Medium Density"
  rect 1.3x1.8 smd: 1(-1.45,0) 2(1.45,0)
  silkscreen extent -2.37,-1.12 2.37,1.12
CP_32_2-M [mil]
  rect 36x12 smd mask+0: 1(-96.5,68.9) 2(-96.5,49.21) 3(-96.5,29.53) 4(-96.5,9.84) 5(-96.5,-9.84) 6(-96.5,-29.53) 7(-96.5,-49.21) 8(-96.5,-68.9) 17(96.5,-68.9) 18(96.5,-49.21) 19(96.5,-29.53) 20(96.5,-9.84) 21(96.5,9.84) 22(96.5,29.53) 23(96.5,49.21) 24(96.5,68.9)
  rect 12x36 smd mask+0: 9(-68.9,-96.5) 10(-49.21,-96.5) 11(-29.53,-96.5) 12(-9.84,-96.5) 13(9.84,-96.5) 14(29.53,-96.5) 15(49.21,-96.5) 16(68.9,-96.5) 25(68.9,96.5) 26(49.21,96.5) 27(29.53,96.5) 28(9.84,96.5) 29(-9.84,96.5) 30(-29.53,96.5) 31(-49.21,96.5) 32(-68.9,96.5)
  rect 128x128 smd: 33(0,0)
  silkscreen extent -127,-98 98,102
DART-SD410 [mm] "Variscite DART-SD410 SoM"
  round 2.896 hole 1.499: 0(1.81,23.19) 0(40.83,1.83)
  rect 0.2x1.14 smd: 1(25.3,4.02) 2(25.3,1.38) 3(24.9,4.02) 4(24.9,1.38) 5(24.5,4.02) 6(24.5,1.38) 7(24.1,4.02) 8(24.1,1.38) 9(23.7,4.02) 10(23.7,1.38) 11(23.3,4.02) 12(23.3,1.38) 13(22.9,4.02) 14(22.9,1.38) 15(22.5,4.02) 16(22.5,1.38) 17(22.1,4.02) 18(22.1,1.38) 19(21.7,4.02) 20(21.7,1.38) 21(21.3,4.02) 22(21.3,1.38) 23(20.9,4.02) 24(20.9,1.38) 25(20.5,4.02) 26(20.5,1.38) 27(20.1,4.02) 28(20.1,1.38) 29(19.7,4.02) 30(19.7,1.38) 31(19.3,4.02) 32(19.3,1.38) 33(18.9,4.02) 34(18.9,1.38) 35(18.5,4.02) 36(18.5,1.38) 37(18.1,4.02) 38(18.1,1.38) 39(17.7,4.02) 40(17.7,1.38) 41(17.3,4.02) 42(17.3,1.38) 43(16.9,4.02) 44(16.9,1.38) 45(16.5,4.02) 46(16.5,1.38) 47(16.1,4.02) 48(16.1,1.38) 49(15.7,4.02) 50(15.7,1.38) 51(15.3,4.02) 52(15.3,1.38) 53(14.9,4.02) 54(14.9,1.38) 55(14.5,4.02) 56(14.5,1.38) 57(14.1,4.02) 58(14.1,1.38) 59(13.7,4.02) 60(13.7,1.38) 61(13.3,4.02) 62(13.3,1.38) 63(12.9,4.02) 64(12.9,1.38) 65(12.5,4.02) 66(12.5,1.38) 67(12.1,4.02) 68(12.1,1.38) 69(11.7,4.02) 70(11.7,1.38) 71(11.3,4.02) 72(11.3,1.38) 73(10.9,4.02) 74(10.9,1.38) 75(10.5,4.02) 76(10.5,1.38) 77(10.1,4.02) 78(10.1,1.38) 79(9.7,4.02) 80(9.7,1.38) 81(9.3,4.02) 82(9.3,1.38) 83(8.9,4.02) 84(8.9,1.38) 85(8.5,4.02) 86(8.5,1.38) 87(8.1,4.02) 88(8.1,1.38) 89(7.7,4.02) 90(7.7,1.38) 101(25.3,23.62) 102(25.3,20.98) 103(24.9,23.62) 104(24.9,20.98) 105(24.5,23.62) 106(24.5,20.98) 107(24.1,23.62) 108(24.1,20.98) 109(23.7,23.62) 110(23.7,20.98) 111(23.3,23.62) 112(23.3,20.98) 113(22.9,23.62) 114(22.9,20.98) 115(22.5,23.62) 116(22.5,20.98) 117(22.1,23.62) 118(22.1,20.98) 119(21.7,23.62) 120(21.7,20.98) 121(21.3,23.62) 122(21.3,20.98) 123(20.9,23.62) 124(20.9,20.98) 125(20.5,23.62) 126(20.5,20.98) 127(20.1,23.62) 128(20.1,20.98) 129(19.7,23.62) 130(19.7,20.98) 131(19.3,23.62) 132(19.3,20.98) 133(18.9,23.62) 134(18.9,20.98) 135(18.5,23.62) 136(18.5,20.98) 137(18.1,23.62) 138(18.1,20.98) 139(17.7,23.62) 140(17.7,20.98) 141(17.3,23.62) 142(17.3,20.98) 143(16.9,23.62) 144(16.9,20.98) 145(16.5,23.62) 146(16.5,20.98) 147(16.1,23.62) 148(16.1,20.98) 149(15.7,23.62) 150(15.7,20.98) 151(15.3,23.62) 152(15.3,20.98) 153(14.9,23.62) 154(14.9,20.98) 155(14.5,23.62) 156(14.5,20.98) 157(14.1,23.62) 158(14.1,20.98) 159(13.7,23.62) 160(13.7,20.98) 161(13.3,23.62) 162(13.3,20.98) 163(12.9,23.62) 164(12.9,20.98) 165(12.5,23.62) 166(12.5,20.98) 167(12.1,23.62) 168(12.1,20.98) 169(11.7,23.62) 170(11.7,20.98) 171(11.3,23.62) 172(11.3,20.98) 173(10.9,23.62) 174(10.9,20.98) 175(10.5,23.62) 176(10.5,20.98) 177(10.1,23.62) 178(10.1,20.98) 179(9.7,23.62) 180(9.7,20.98) 181(9.3,23.62) 182(9.3,20.98) 183(8.9,23.62) 184(8.9,20.98) 185(8.5,23.62) 186(8.5,20.98) 187(8.1,23.62) 188(8.1,20.98) 189(7.7,23.62) 190(7.7,20.98)
  silkscreen extent 0,0 42.6,25
"DIODES SOT-23-3" [mm] "SOT23, 3-Leads, Body 2.90x2.40mm, Pitch 0.95mm, IPC Medium Density"
  rect 0.95x0.65 smd: 1(-1.15,0.95) 2(1.15,0) 3(-1.15,-0.95)
  silkscreen extent -1.27,-1.5 0.7,1.95
"DO214AC SMA" [mm] "Molded Diode, 2-Leads, Body 4.30x2.60mm, IPC Medium Density"
  rect 2.5x1.7 smd: 1(-2,0) 2(2,0)
  silkscreen extent -3.68,-1.65 3.75,1.65
"FCI USB 10118193-0001LF" [mm] "USB 2.0 Type B Micro"
  oval 0.4x1.35 smd: 1(1.3,-2.625) 2(0.65,-2.625) 3(0,-2.625) 4(-0.65,-2.625) 5(-1.3,-2.625)
  oval 0.9x1.6 hole 0.5 slot 1.2 at 90 deg: S(-3.3,0.05) S(3.3,0.05)
  rrect50% 1.6x1.4 smd: S(-3.2,-2.4) S(3.2,-2.4)
  rect 1.9x1.8 smd: S(-1.2,0.05) S(1.2,0.05)
  silkscreen extent -3.7,-2.8 3.7,2.8
"FER 0402/1005" [mm] "Chip Ferrite, 2-Leads, Body 1.02x0.51mm, IPC Medium Density"
  rect 0.6x0.64 smd: 1(-0.44,0) 2(0.44,0)
  silkscreen extent -1,-0.5 1,0.5
"FER 0603/1608" [mm] "Chip Ferrite, 2-Leads, Body 1.60x0.80mm, IPC Medium Density"
  rect 0.9x1 smd: 1(-0.675,0) 2(0.675,0)
  silkscreen extent -1.4,-0.7 1.4,0.7
FTDI_DFN12 [mm] "DFN/SON"
  rect 0.85x0.25 smd: 1(-1.415,1.125) 2(-1.415,0.675) 3(-1.415,0.225) 4(-1.415,-0.225) 5(-1.415,-0.675) 6(-1.415,-1.125) 7(1.415,-1.125) 8(1.415,-0.675) 9(1.415,-0.225) 10(1.415,0.225) 11(1.415,0.675) 12(1.415,1.125)
  rect 1.58x2.48 smd: 13(0,0)
  silkscreen extent -1.95,-1.65 1.5,1.7
"HIROSE DM3AT-SF-PEJM5" [mm]
  rect 0.7x1.2 smd: 1(3.2,7.825) 2(2.1,7.825) 3(1,7.825) 4(-0.1,7.825) 5(-1.2,7.825) 6(-2.3,7.825) 7(-3.4,7.825) 8(-4.5,7.825) 9(-5.45,7.825)
  rect 1x0.8 smd: 10(-6.55,-2.675)
  rect 1x1.2 smd: S(-6.4,3.525) S(4.75,7.825)
  rect 1x2.8 smd: S(-6.4,-6.775)
  rect 1.3x1.9 smd: S(6.95,-7.275)
  silkscreen extent -6.5,-8.18 7.3,7.93
Hirose_DF40C-90DS-0.4V(51) [mm] "Hirose DF40C-90DS-0.4V(51) Board-to-Board Connector"
  rect 0.2x1.14 on Mech32: 1(8.8,-1.32) 2(8.8,1.32) 3(8.4,-1.32) 4(8.4,1.32) 5(8,-1.32) 6(8,1.32) 7(7.6,-1.32) 8(7.6,1.32) 9(7.2,-1.32) 10(7.2,1.32) 11(6.8,-1.32) 12(6.8,1.32) 13(6.4,-1.32) 14(6.4,1.32) 15(6,-1.32) 16(6,1.32) 17(5.6,-1.32) 18(5.6,1.32) 19(5.2,-1.32) 20(5.2,1.32) 21(4.8,-1.32) 22(4.8,1.32) 23(4.4,-1.32) 24(4.4,1.32) 25(4,-1.32) 26(4,1.32) 27(3.6,-1.32) 28(3.6,1.32) 29(3.2,-1.32) 30(3.2,1.32) 31(2.8,-1.32) 32(2.8,1.32) 33(2.4,-1.32) 34(2.4,1.32) 35(2,-1.32) 36(2,1.32) 37(1.6,-1.32) 38(1.6,1.32) 39(1.2,-1.32) 40(1.2,1.32) 41(0.8,-1.32) 42(0.8,1.32) 43(0.4,-1.32) 44(0.4,1.32) 45(0,-1.32) 46(0,1.32) 47(-0.4,-1.32) 48(-0.4,1.32) 49(-0.8,-1.32) 50(-0.8,1.32) 51(-1.2,-1.32) 52(-1.2,1.32) 53(-1.6,-1.32) 54(-1.6,1.32) 55(-2,-1.32) 56(-2,1.32) 57(-2.4,-1.32) 58(-2.4,1.32) 59(-2.8,-1.32) 60(-2.8,1.32) 61(-3.2,-1.32) 62(-3.2,1.32) 63(-3.6,-1.32) 64(-3.6,1.32) 65(-4,-1.32) 66(-4,1.32) 67(-4.4,-1.32) 68(-4.4,1.32) 69(-4.8,-1.32) 70(-4.8,1.32) 71(-5.2,-1.32) 72(-5.2,1.32) 73(-5.6,-1.32) 74(-5.6,1.32) 75(-6,-1.32) 76(-6,1.32) 77(-6.4,-1.32) 78(-6.4,1.32) 79(-6.8,-1.32) 80(-6.8,1.32) 81(-7.2,-1.32) 82(-7.2,1.32) 83(-7.6,-1.32) 84(-7.6,1.32) 85(-8,-1.32) 86(-8,1.32) 87(-8.4,-1.32) 88(-8.4,1.32) 89(-8.8,-1.32) 90(-8.8,1.32)
HIROSE_FH58M-7S-0.25SHW-99 [mm] "Hirose FH58M-7S-0.25SHW(99) Top+Bottom Contacts 7-pin FFC Connector"
  rect 0.25x0.65 smd: 1(0.75,-0.7) 2(0.5,1.8) 3(0.25,-0.7) 4(0,1.8) 5(-0.25,-0.7) 6(-0.5,1.8) 7(-0.75,-0.7)
  rect 0.27x0.65 smd: S(-1.25,-0.7) S(1.25,-0.7)
  silkscreen extent -1.8,-1.32 1.8,2.2
LAIRD_TYS6028 [mm] "Laird TYS6028 series inductor"
  rect 2x6 smd: 1(-2.1,0) 2(2.1,0)
  silkscreen extent -0.8,-2.8 0.8,2.8
LCMXO3_caBGA_BG256 [mm] "BGA, 256-Leads, Body 14.00x14.00mmx1.70mm, Pitch 0.80mm"
  round 0.4 smd: A1(-6,6) A2(-5.2,6) A3(-4.4,6) A4(-3.6,6) A5(-2.8,6) A6(-2,6) A7(-1.2,6) A8(-0.4,6) A9(0.4,6) A10(1.2,6) A11(2,6) A12(2.8,6) A13(3.6,6) A14(4.4,6) A15(5.2,6) A16(6,6) B1(-6,5.2) B2(-5.2,5.2) B3(-4.4,5.2) B4(-3.6,5.2) B5(-2.8,5.2) B6(-2,5.2) B7(-1.2,5.2) B8(-0.4,5.2) B9(0.4,5.2) B10(1.2,5.2) B11(2,5.2) B12(2.8,5.2) B13(3.6,5.2) B14(4.4,5.2) B15(5.2,5.2) B16(6,5.2) C1(-6,4.4) C2(-5.2,4.4) C3(-4.4,4.4) C4(-3.6,4.4) C5(-2.8,4.4) C6(-2,4.4) C7(-1.2,4.4) C8(-0.4,4.4) C9(0.4,4.4) C10(1.2,4.4) C11(2,4.4) C12(2.8,4.4) C13(3.6,4.4) C14(4.4,4.4) C15(5.2,4.4) C16(6,4.4) D1(-6,3.6) D2(-5.2,3.6) D3(-4.4,3.6) D4(-3.6,3.6) D5(-2.8,3.6) D6(-2,3.6) D7(-1.2,3.6) D8(-0.4,3.6) D9(0.4,3.6) D10(1.2,3.6) D11(2,3.6) D12(2.8,3.6) D13(3.6,3.6) D14(4.4,3.6) D15(5.2,3.6) D16(6,3.6) E1(-6,2.8) E2(-5.2,2.8) E3(-4.4,2.8) E4(-3.6,2.8) E5(-2.8,2.8) E6(-2,2.8) E7(-1.2,2.8) E8(-0.4,2.8) E9(0.4,2.8) E10(1.2,2.8) E11(2,2.8) E12(2.8,2.8) E13(3.6,2.8) E14(4.4,2.8) E15(5.2,2.8) E16(6,2.8) F1(-6,2) F2(-5.2,2) F3(-4.4,2) F4(-3.6,2) F5(-2.8,2) F6(-2,2) F7(-1.2,2) F8(-0.4,2) F9(0.4,2) F10(1.2,2) F11(2,2) F12(2.8,2) F13(3.6,2) F14(4.4,2) F15(5.2,2) F16(6,2) G1(-6,1.2) G2(-5.2,1.2) G3(-4.4,1.2) G4(-3.6,1.2) G5(-2.8,1.2) G6(-2,1.2) G7(-1.2,1.2) G8(-0.4,1.2) G9(0.4,1.2) G10(1.2,1.2) G11(2,1.2) G12(2.8,1.2) G13(3.6,1.2) G14(4.4,1.2) G15(5.2,1.2) G16(6,1.2) H1(-6,0.4) H2(-5.2,0.4) H3(-4.4,0.4) H4(-3.6,0.4) H5(-2.8,0.4) H6(-2,0.4) H7(-1.2,0.4) H8(-0.4,0.4) H9(0.4,0.4) H10(1.2,0.4) H11(2,0.4) H12(2.8,0.4) H13(3.6,0.4) H14(4.4,0.4) H15(5.2,0.4) H16(6,0.4) J1(-6,-0.4) J2(-5.2,-0.4) J3(-4.4,-0.4) J4(-3.6,-0.4) J5(-2.8,-0.4) J6(-2,-0.4) J7(-1.2,-0.4) J8(-0.4,-0.4) J9(0.4,-0.4) J10(1.2,-0.4) J11(2,-0.4) J12(2.8,-0.4) J13(3.6,-0.4) J14(4.4,-0.4) J15(5.2,-0.4) J16(6,-0.4) K1(-6,-1.2) K2(-5.2,-1.2) K3(-4.4,-1.2) K4(-3.6,-1.2) K5(-2.8,-1.2) K6(-2,-1.2) K7(-1.2,-1.2) K8(-0.4,-1.2) K9(0.4,-1.2) K10(1.2,-1.2) K11(2,-1.2) K12(2.8,-1.2) K13(3.6,-1.2) K14(4.4,-1.2) K15(5.2,-1.2) K16(6,-1.2) L1(-6,-2) L2(-5.2,-2) L3(-4.4,-2) L4(-3.6,-2) L5(-2.8,-2) L6(-2,-2) L7(-1.2,-2) L8(-0.4,-2) L9(0.4,-2) L10(1.2,-2) L11(2,-2) L12(2.8,-2) L13(3.6,-2) L14(4.4,-2) L15(5.2,-2) L16(6,-2) M1(-6,-2.8) M2(-5.2,-2.8) M3(-4.4,-2.8) M4(-3.6,-2.8) M5(-2.8,-2.8) M6(-2,-2.8) M7(-1.2,-2.8) M8(-0.4,-2.8) M9(0.4,-2.8) M10(1.2,-2.8) M11(2,-2.8) M12(2.8,-2.8) M13(3.6,-2.8) M14(4.4,-2.8) M15(5.2,-2.8) M16(6,-2.8) N1(-6,-3.6) N2(-5.2,-3.6) N3(-4.4,-3.6) N4(-3.6,-3.6) N5(-2.8,-3.6) N6(-2,-3.6) N7(-1.2,-3.6) N8(-0.4,-3.6) N9(0.4,-3.6) N10(1.2,-3.6) N11(2,-3.6) N12(2.8,-3.6) N13(3.6,-3.6) N14(4.4,-3.6) N15(5.2,-3.6) N16(6,-3.6) P1(-6,-4.4) P2(-5.2,-4.4) P3(-4.4,-4.4) P4(-3.6,-4.4) P5(-2.8,-4.4) P6(-2,-4.4) P7(-1.2,-4.4) P8(-0.4,-4.4) P9(0.4,-4.4) P10(1.2,-4.4) P11(2,-4.4) P12(2.8,-4.4) P13(3.6,-4.4) P14(4.4,-4.4) P15(5.2,-4.4) P16(6,-4.4) R1(-6,-5.2) R2(-5.2,-5.2) R3(-4.4,-5.2) R4(-3.6,-5.2) R5(-2.8,-5.2) R6(-2,-5.2) R7(-1.2,-5.2) R8(-0.4,-5.2) R9(0.4,-5.2) R10(1.2,-5.2) R11(2,-5.2) R12(2.8,-5.2) R13(3.6,-5.2) R14(4.4,-5.2) R15(5.2,-5.2) R16(6,-5.2) T1(-6,-6) T2(-5.2,-6) T3(-4.4,-6) T4(-3.6,-6) T5(-2.8,-6) T6(-2,-6) T7(-1.2,-6) T8(-0.4,-6) T9(0.4,-6) T10(1.2,-6) T11(2,-6) T12(2.8,-6) T13(3.6,-6) T14(4.4,-6) T15(5.2,-6) T16(6,-6)
  silkscreen extent -7.78,-7 7,7
"LED 0603/1608 BLUE" [mm] "Chip Diode, 2-Leads, Body 1.60x0.80mm, IPC Medium Density"
  rect 0.8x0.8 smd: 1(-0.75,0) 2(0.75,0)
  silkscreen extent -1.52,-0.7 1.52,0.7
"LED 0603/1608 GREEN" [mm] "Chip Diode, 2-Leads, Body 1.60x0.80mm, IPC Medium Density"
  rect 0.8x0.8 smd: 1(-0.75,0) 2(0.75,0)
  silkscreen extent -1.52,-0.7 1.52,0.7
"LED 0603/1608 RED" [mm] "Chip Diode, 2-Leads, Body 1.60x0.80mm, IPC Medium Density"
  rect 0.8x0.8 smd: 1(-0.75,0) 2(0.75,0)
  silkscreen extent -1.52,-0.7 1.52,0.7
"LED 0603/1608 YELLOW" [mm] "Chip Diode, 2-Leads, Body 1.60x0.80mm, IPC Medium Density"
  rect 0.8x0.8 smd: 1(-0.75,0) 2(0.75,0)
  silkscreen extent -1.52,-0.7 1.52,0.7
MEMS_MIC [mm] "Generic 3-pin bottom mount MEMS mic"
  rect 0.29x0.53 smd: 1(-0.588,0.935) 2(0.002,0.935) 3(0.592,0.935)
  round 1.45 hole 0.9: 4(0.007,-0.48)
  silkscreen extent -0.93,-1.35 0.94,1.4
"NXP SOT-323-3" [mm] "SOT323, 3-Leads, Body 2.00x2.10mm, Pitch 0.65mm, IPC Medium Density"
  rect 0.55x0.6 smd: 1(-0.925,0.65) 2(0.925,0) 3(-0.925,-0.65)
  silkscreen extent -1.07,-1.1 0.67,1.68
NXP_SOT23 [mm] "NXP SOT23 from PMV30XPEA"
  rect 0.9x0.6 smd: 1(-1.15,0.95) 2(-1.15,-0.95) 3(1.15,0)
  silkscreen extent -1.27,-1.5 0.7,1.92
OSC_2.5x2.0mm [mm] "SMD MEMS oscillator, 2.5x2.0 mm"
  rect 0.65x0.85 smd: 1(0,0) 2(1.65,0) 3(1.65,1.55) 4(0,1.55)
  silkscreen extent -0.47,-0.8 2.13,1.77
PANASONIC_EVQ-P7A [mm] "EVQ-P7A01P Tact Switch SMT Right Angle"
  rect 1.4x1.05 smd mask+0: 1(-1.8,0.725) 1(1.8,0.725) 2(-1.8,-0.725) 2(1.8,-0.725)
  silkscreen extent -1.75,-2 1.75,1.5
"RES 0402/1005" [mm] "Chip Resistor, 2-Leads, Body 1.0x0.5mm, IPC Medium Density"
  rect 0.75x0.6 smd: 1(-0.575,0) 2(0.575,0)
  silkscreen extent -1.14,-0.51 1.14,0.51
"RES 0603/1608" [mm] "Chip Resistor, 2-Leads, Body 1.60x0.80mm, IPC Medium Density"
  rect 0.85x0.95 smd: 1(-0.65,0) 2(0.65,0)
  silkscreen extent -1.27,-0.7 1.27,0.7
"RES 0805/2012" [mm] "Chip Resistor, 2-Leads, Body 2.00x1.25mm, IPC Medium Density"
  rect 1.15x1.35 smd: 1(-0.875,0) 2(0.875,0)
  silkscreen extent -1.7,-0.9 1.7,0.9
ROHM_SSOP5 [mm] "ROHM SSOP5 from BUxxSD5 series datasheet"
  rect 0.95x0.6 smd: 1(-1.375,0.95) 2(-1.375,0) 3(-1.375,-0.95) 4(1.375,-0.95) 5(1.375,0.95)
  silkscreen extent -1.5,-1.55 0.5,1.92
SAMSUNG_BP2000 [mm] "Samsung BP2000 2000mAh battery for Galaxy Camera 2"
  rect 4.064x1.905 smd: 1(-2.7,-8) 2(-2.7,-10.5) 3(-2.7,-13) 4(-2.7,-15.5)
  silkscreen extent -3.5,-16.8 0.6,-6.7
"STACKPOLE CSR1206" [mm] "Chip Resistor, 2-Leads, Body 3.13x1.55mm, IPC Medium Density"
  rect 1.15x1.7 smd: 1(-1.575,0) 2(1.575,0)
  silkscreen extent -2.4,-1.1 2.4,1.1
TE_USB-C_2129691-1 [mm] "USB-C Hybrid In-Board Mount"
  rect 0.35x0.6 smd: A1(2.75,-4.5) A2(2.25,-4.5) A3(1.75,-4.5) A4(1.25,-4.5) A5(0.75,-4.5) A6(0.25,-4.5) A7(-0.25,-4.5) A8(-0.75,-4.5) A9(-1.25,-4.5) A10(-1.75,-4.5) A11(-2.25,-4.5) A12(-2.75,-4.5)
  oval 1.15x0.65 hole 0.4 slot 0.9 at 0 deg: B1(-3.2,-3.36) B12(3.2,-3.36)
  round 0.65 hole 0.4: B2(-2.5,-2.46) B3(-1.7,-2.46) B4(-1.3,-3.36) B5(-0.85,-2.46) B6(-0.4,-3.36) B7(0.4,-3.36) B8(0.85,-2.46) B9(1.3,-3.36) B10(1.7,-2.46) B11(2.5,-2.46)
  round 0.6 hole 0.6 unplated mask+0: M(-3.45,-4.5) M(3.45,-4.5)
  oval 1x2.56 hole 0.5 slot 1.5 at 90 deg: S(-6.075,-2.56) S(-6.075,1.2) S(6.075,-2.56) S(6.075,1.3)
  oval 1x1.6 hole 0.5 slot 1.1 at 90 deg: S(-4.475,-4.9) S(4.475,-4.9)
  rect 0.5x0.3 smd: S(-3.2,-5.19) S(-1,-5.19) S(1,-5.19) S(3.2,-5.19)
  silkscreen extent -5.4,-5.6 5.4,1.9
TI_SON6 [mm] "Small Outline No-Lead, 6 pin"
  rect 0.3x0.52 smd: 1(-0.5,-0.38) 2(0,-0.38) 3(0.5,-0.38) 4(0.5,0.38) 5(0,0.38) 6(-0.5,0.38)
  silkscreen extent -1.1,-0.5 -0.9,-0.3
TI_SOT-563_DRL [mm] "SOTFL, 6-Leads, Body 1.60x1.60mm, Pitch 0.50mm, IPC Medium Density"
  rect 0.6x0.3 smd: 1(-0.775,0.5) 2(-0.775,0) 3(-0.775,-0.5) 4(0.775,-0.5) 5(0.775,0) 6(0.775,0.5)
  silkscreen extent -0.9,-0.85 0.1,1.33
TP_SMD_1MM_SQ [mm] "1mm square SMD test point"
  rect 1x1 smd: 1(0,0)
  silkscreen extent -0.7,-0.7 0.7,0.7
TP_SMD_JULIAN [mm] "Julian Extra-Large SMD test point"
  rect 2.5x1.25 smd: 1(0,0)
  silkscreen extent -1.4,-0.8 1.4,0.8